# Altium PCB PCB.PcbDoc (part 2 of 2)
Units mm, origin at the board's own origin, x right, y up, seen from the top; angles counter-clockwise.
Board outline 90 x 38 mm, 2 copper layers (Top Layer, Bottom Layer), stack 1.499 mm thick; 46 components, 39 nets, 189 pads, 43 vias.
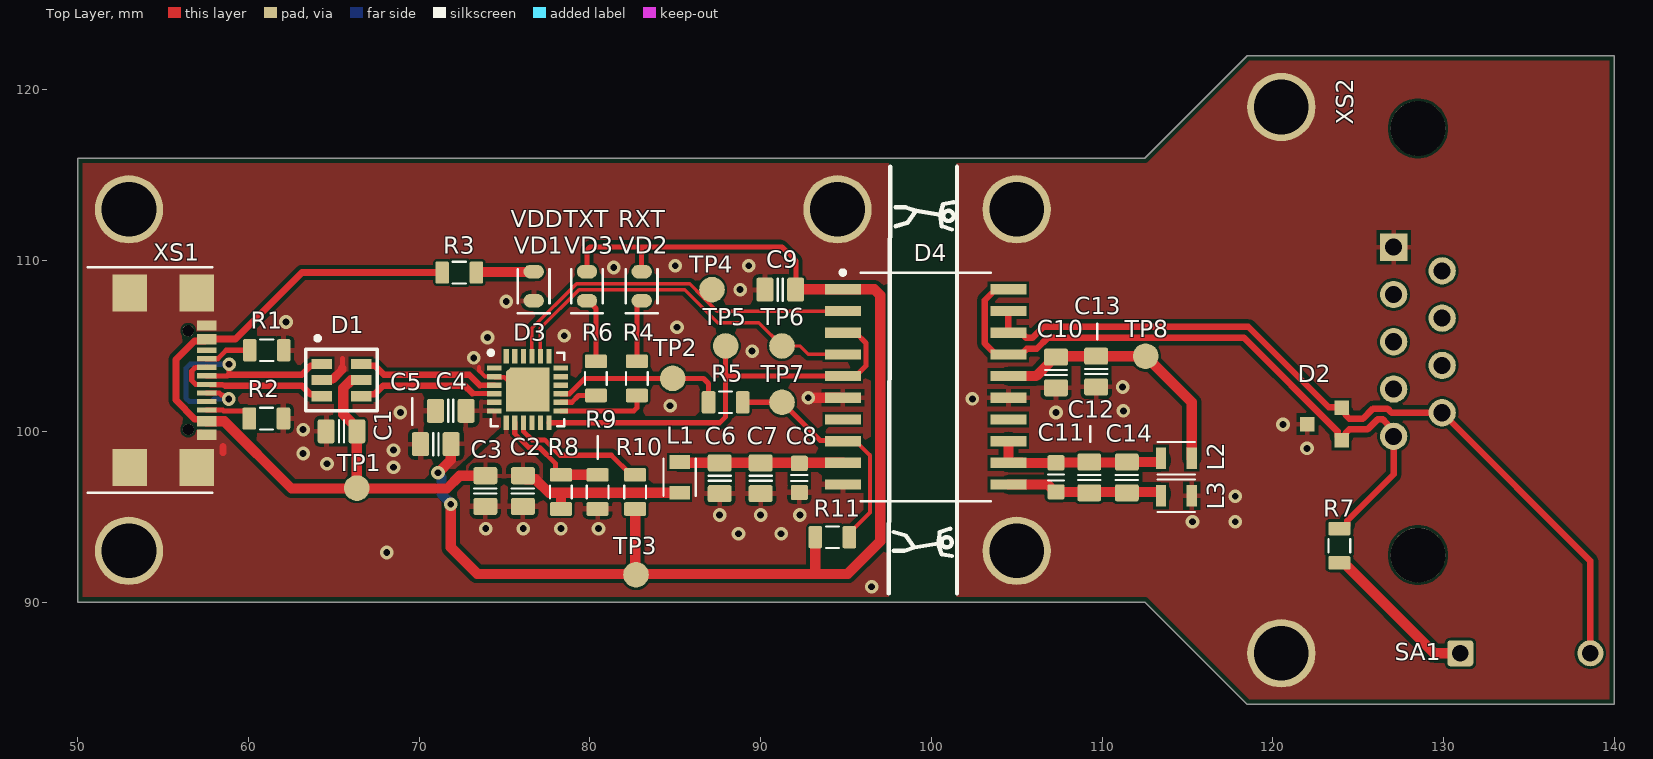
[diagram p0: Top Layer view]

## Via types
v1: diameter 0.8, hole 0.4, Top Layer to Bottom Layer, 43 vias

## Nets (pads, with @x,y where several pads share a name; then routed paths per layer and width w, separated by ;. In a path a pad name is that pad's centre, name@x,y a point inside that pad or via, vN(x,y) a via of type N, cw(c..) or ccw(c..) an arc to the next point about the centre after c; other vN are vias at no path point) (continued)
USB_D_P: (continued)
  Bottom Layer w0.3: v1(58.843,101.895) 57.988,101.895 57.843,101.75 56.526,101.75 56.35,101.926 56.35,103.7 56.581,103.931 v1(58.869,103.931)
VBUS: C1.2 C2.2 C3.2 D1.5 D3.7 L1.2 R3.1 R8.2 TP1.1 XS1.A4/B9 XS1.A9/B4 | length 58.5
  Top Layer w0.4: XS1.A9/B4 57.445,100.705 56.876,100.705 55.75,101.831 55.75,104.203 56.842,105.295 57.445,105.295 XS1.A4/B9 59.239,105.4 63.139,109.3 R3.1
  Top Layer w0.6: XS1.A9/B4 57.555,100.595 58.577,100.595 62.521,96.651 TP1.1@66.325,96.651 ; C1.2 TP1.1 66.326,96.651 71.628,96.651 72.378,97.4 C3.2@73.875,97.4 ; C1.2@66.35,100.2 65.55,101 65.55,102.536 66.014,103 D1.5 ; C2.2 76.275,97.2 76.806,97.2 77.606,96.4 78.3,96.4 ; R8.2 78.3,96.4 ; L1.2 78.3,96.4
VBUS_D: D3.8 R8.1 R9.2 | length 6.7
  Top Layer w0.3: D3.8 75.6,99.864 76.414,99.05 77.05,99.05 77.976,98.124 77.976,97.7 78.226,97.45 R8.1
  Top Layer w0.6: R8.1 R9.2
VDD_ISOW1432DFMR: C6.2 C7.2 C8.2 D4.9 L1.1 | length 9.6
  Top Layer w0.6: L1.1 85.29,98.16 92.228,98.16 92.232,98.155 D4.9
VIO: C4.2 C5.2 C9.2 D3.5 D3.6 D4.1 R10.2 R11.2 TP3.1 VD2.2 VD3.2 | length 75.7
  Top Layer w0.3: VD3.2 79.83,110.624 80.006,110.8 83.05,110.8 ; VD2.2 83.03,110.78 83.05,110.8 ; C9.2@92.065,108.315 92.065,109.985 91.25,110.8 83.05,110.8
  Top Layer w0.6: v1@71.142,97.609 71.853,98.32 71.853,99.228 C5.2 ; v1(71.85,95.725) 71.85,93.2 73.4,91.65 TP3.1@82.65,91.65 ; R10.2 TP3.1@82.65,91.65 ; C9.2@92.065,108.315 96.649,108.315 97,107.964 97,93.55 95.1,91.65 93.2,91.65 ; R11.2 93.2,91.65 ; TP3.1@82.65,91.65 93.2,91.65
  Bottom Layer w0.6: v1(71.104,97.571) 71.104,97.516 71.3,97.32 71.3,96.329 71.85,95.779 v1(71.85,95.725)
VISO: C10.2 C13.2 D4.16 L2.1 TP8.1 | length 15.7
  Top Layer w0.6: D4.16 106.134,103.235 106.899,104 106.899,104.15 107.149,104.4 C13.2 TP8.1 115.25,101.7 L2.1
Visoout: C11.2 C12.2 C14.2 D4.12 D4.13 L2.2 | length 10.5
  Top Layer w0.6: D4.13 D4.12 105.266,98.155 105.271,98.15 C11.2 107.325,98.175 111.425,98.175 C14.2 113.45,98.2 L2.2
pads on no net: C1.0 C2.0 C3.0 C4.0 C5.0 C6.0 C7.0 C8.0 C9.0 C10.0 C11.0 C12.0 C13.0 C14.0 D3.10 D3.16 R1.0 R2.0 R3.0 R4.0 R5.0 R6.0 R7.0 R8.0 R9.0 R10.0 R11.0 XS1.13 XS1.14 XS1.A8 XS1.B8 XS2. XS2.2 XS2.3 XS2.4 XS2.6 XS2.7 XS2.8

## Polygon pours and split planes (outlines as drawn)
GND_ISO on Top Layer "GND_ISO_L01_P007" (solid, pour order 7): 101.5,116 101.5,90 112.5,90 118.5,84 140,84 140,122 118.5,122 112.5,116
GND on Top Layer "GND_L01_P004" (solid, remove dead copper, pour order 4): 50,116 97.5,116 97.5,90 50,90
VIO on Top Layer "VIO_L01_P001" (solid, pour order 1): 71.6,97.8 71.6,99.8 72.575,99.8 72.575,101.85 74.775,101.85 74.775,100.231 72.123,97.8
VBUS on Top Layer "VBUS_L01_P000" (solid, pour order 0): 72.75,97.995 74.95,99.986 74.95,100.8 75.25,100.8 75.25,100.022 77.25,98.1 77.25,97.25 72.75,97.25
GND on Bottom Layer "GND_L02_P002" (solid, pour order 2): 50,116 97.5,116 97.5,90 50,90
GND_ISO on Bottom Layer "GND_ISO_L02_P005" (solid, pour order 5): 101.5,116 101.5,90 112.5,90 118.5,84 140,84 140,122 118.5,122 112.5,116

## Silkscreen, mask and mechanical layers (free items; w line width, h text height)
Top Overlay:
  circle w0.254: c101,112.617 r0.3
  circle w0.254: c100.9,93.5 r0.3
  lines w0.15: 69.6,100.4 69.6,101.95 ; 80.45,98.4 80.45,99.7 ; 109.308,99.4 109.308,100.3 ; 109.708,105.4 109.708,106.3
  lines w0.254: 97.5,90.5 97.597,115.5 ; 97.8,93 98.4,93 99,93.2 ; 97.8,94.1 98.5,93.9 99,93.2 ; 97.9,112.017 98.6,112.217 99.1,112.917 ; 97.9,113.117 98.5,113.117 99.1,112.917 ; 101.1,94.3 100.5,94.1 100.4,93.433 ; 101.2,92.7 100.6,92.8 100.4,93.433 ; 101.2,111.817 100.6,112.017 100.5,112.683 ; 101.3,113.417 100.7,113.317 100.5,112.683 ; 101.5,90.5 101.5,115.5 ; 99,93.2 100.4,93.433 ; 99.1,112.917 100.5,112.683
  text "VDD" at 75.354,111.954 h1
  text "TXT" at 78.454,111.954 h1
  text "RXT" at 81.654,111.954 h1
Bottom Overlay:
  lines w0.15: 98.3,93.9 100.7,93.9 ; 98.3,94.2 100.7,94.2 ; 98.3,111.7 100.7,111.7 ; 98.3,112 100.7,112
  lines w0.2: 97.6,92.8 97.9,92.8 97.9,93.2 ; 97.6,95.2 97.9,95.2 97.9,94.8 ; 97.6,110.6 97.9,110.6 97.9,111 ; 97.6,113 97.9,113 97.9,112.6 ; 101.5,92.8 101.1,92.8 101.1,93.2 ; 101.5,95.2 101.1,95.2 101.1,94.8 ; 101.5,110.6 101.1,110.6 101.1,111 ; 101.5,113 101.1,113 101.1,112.6 ; 97.9,93.2 97.9,94.8 ; 97.9,93.2 98.3,93.2 98.3,93.6 ; 97.9,94.8 98.3,94.8 98.3,94.5 ; 97.9,111 98.3,111 98.3,111.4 ; 97.9,111 97.9,112.6 ; 97.9,112.6 98.3,112.6 98.3,112.3 ; 98.3,93.6 98.3,94.5 ; 98.3,93.6 100.7,93.6 ; 98.3,94.5 100.7,94.5 ; 98.3,111.4 100.7,111.4 ; 98.3,111.4 98.3,112.3 ; 98.3,112.3 100.7,112.3 ; 100.7,93.6 100.7,93.2 101.1,93.2 ; 100.7,93.6 100.7,94.5 ; 100.7,94.5 100.7,94.8 101.1,94.8 ; 100.7,111.4 100.7,112.3 ; 100.7,111.4 100.7,111 101.1,111 ; 100.7,112.3 100.7,112.6 101.1,112.6 ; 101.1,93.2 101.1,94.8 ; 101.1,111 101.1,112.6
  lines w0.254: 97.5,90.5 97.5,115.5 ; 101.5,90.5 101.5,115.5
  text ".Обозначение" at 79.246,112.254 h1.52
  text "RS485" at 136.15,111.031 h2.5 r90
  text "120 Om" at 137.746,88.754 h1.2
Top Solder:
  region: 73.9,103.9 73.9,101 74.9,101 74.9,100 77.8,100 77.8,101 78.8,101 78.8,103.9 77.8,103.9 77.8,104.9 74.9,104.9 74.9,103.9
Mechanical 1:
  the board outline again, w0.254
Construction:
  lines w0.05: 50.022,97.069 51.659,108.931 ; 50.022,108.931 51.659,97.069
  lines w0.1: 50,103 140,103 ; 99.66,95.9 99.66,109
  lines w0.254: 50,95.5 60.5,95.5 ; 50,110.5 60.5,110.5 ; 97.5,90 97.5,116 ; 101.5,90 101.5,116
Drill Drawing:
  circle w0.254: c58.556,155.92 r0.847
  lines w0.254: 57.709,143.643 59.403,143.643 59.403,145.337 57.709,145.337 57.709,143.643 ; 57.709,149.147 59.403,149.147 58.556,147.453 57.709,149.147 ; 57.709,151.687 58.133,151.687 58.133,151.263 58.979,151.263 58.979,151.687 59.403,151.687 59.403,152.533 58.979,152.533 58.979,152.957 58.133,152.957 58.133,152.533 57.709,152.533 57.709,151.687 ; 57.709,159.307 58.133,159.307 58.556,158.883 58.979,159.307 59.403,159.307 58.979,159.73 59.403,160.153 58.979,160.153 58.556,160.577 58.133,160.153 57.709,160.153 58.133,159.73 57.709,159.307 ; 57.709,162.693 58.556,163.117 59.403,162.693 58.979,163.54 59.403,164.387 58.556,163.963 57.709,164.387 58.133,163.54 57.709,162.693
  lines w0.381: 56.19,142.5 131.203,142.5 ; 56.19,165.36 131.203,165.36 ; 70.183,138.69 70.183,169.17 ; 83.895,138.69 83.895,169.17 ; 102.229,138.69 102.229,169.17 ; 115.078,138.69 115.078,169.17 ; 56.19,138.69 131.203,138.69 131.203,169.17 56.19,169.17 56.19,138.69
  text "Symbol" at 58.476,166.503 h1.83
  text "Count" at 71.326,166.503 h1.83
  text "Hole Size" at 85.038,166.503 h1.83
  text "Plated" at 103.372,166.503 h1.83
  text "Via/Pad" at 116.221,166.503 h1.83
  text "43" at 71.326,162.693 h1.52
  text "0.400mm" at 85.038,162.693 h1.52
  text "PTH" at 103.372,162.693 h1.52
  text "Via" at 116.221,162.693 h1.52
  text "2" at 71.326,158.883 h1.52
  text "0.970mm" at 85.038,158.883 h1.52
  text "PTH" at 103.372,158.883 h1.52
  text "Pad" at 116.221,158.883 h1.52
  text "9" at 71.326,155.073 h1.52
  text "1.000mm" at 85.038,155.073 h1.52
  text "PTH" at 103.372,155.073 h1.52
  text "Pad" at 116.221,155.073 h1.52
  text "7" at 71.326,151.263 h1.52
  text "3.200mm" at 85.038,151.263 h1.52
  text "PTH" at 103.372,151.263 h1.52
  text "Pad" at 116.221,151.263 h1.52
  text "2" at 71.326,147.453 h1.52
  text "0.660mm" at 85.038,147.453 h1.52
  text "NPTH" at 103.372,147.453 h1.52
  text "Pad" at 116.221,147.453 h1.52
  text "2" at 71.326,143.643 h1.52
  text "3.200mm" at 85.038,143.643 h1.52
  text "NPTH" at 103.372,143.643 h1.52
  text "Pad" at 116.221,143.643 h1.52
  text "65 Total" at 71.326,139.833 h1.52

## Dimensions
94.5,113 to 105,113 on Mechanical 1
53,113 to 94.5,113 on Mechanical 1
53,93 to 53,113 on Mechanical 1
140,103 to 140,84 on Construction
50,90 to 112.5,90 on Mechanical 1
112.5,116 to 118.5,122 on Mechanical 1
50,116.5 to 140,122 on Mechanical 1
50,90 to 50,116 on Mechanical 1
118.5,84 to 140,84 on Mechanical 1
49.619,103 to 50,95.5 on Construction
50,103 to 50,110.5 on Construction
140,122 to 140,103 on Construction

## Text inside footprints (layer, text, board x,y; h text height)
D4: Mechanical 13 "*" at 95.932,107.718 h1.27
XS1: Mechanical 13 "*" at 56.915,109.058 h1.27 r270